# Altium PCB Revolution.PcbDoc (part 2 of 2)
Units mil, origin at the board's own origin, x right, y up, seen from the top; angles counter-clockwise.
Board outline 1417.32 x 1417.32 mil, 4 copper layers (Top Layer, Power, Ground, Bottom Layer), stack 89.2 mil thick; 97 components, 92 nets, 401 pads, 208 vias.
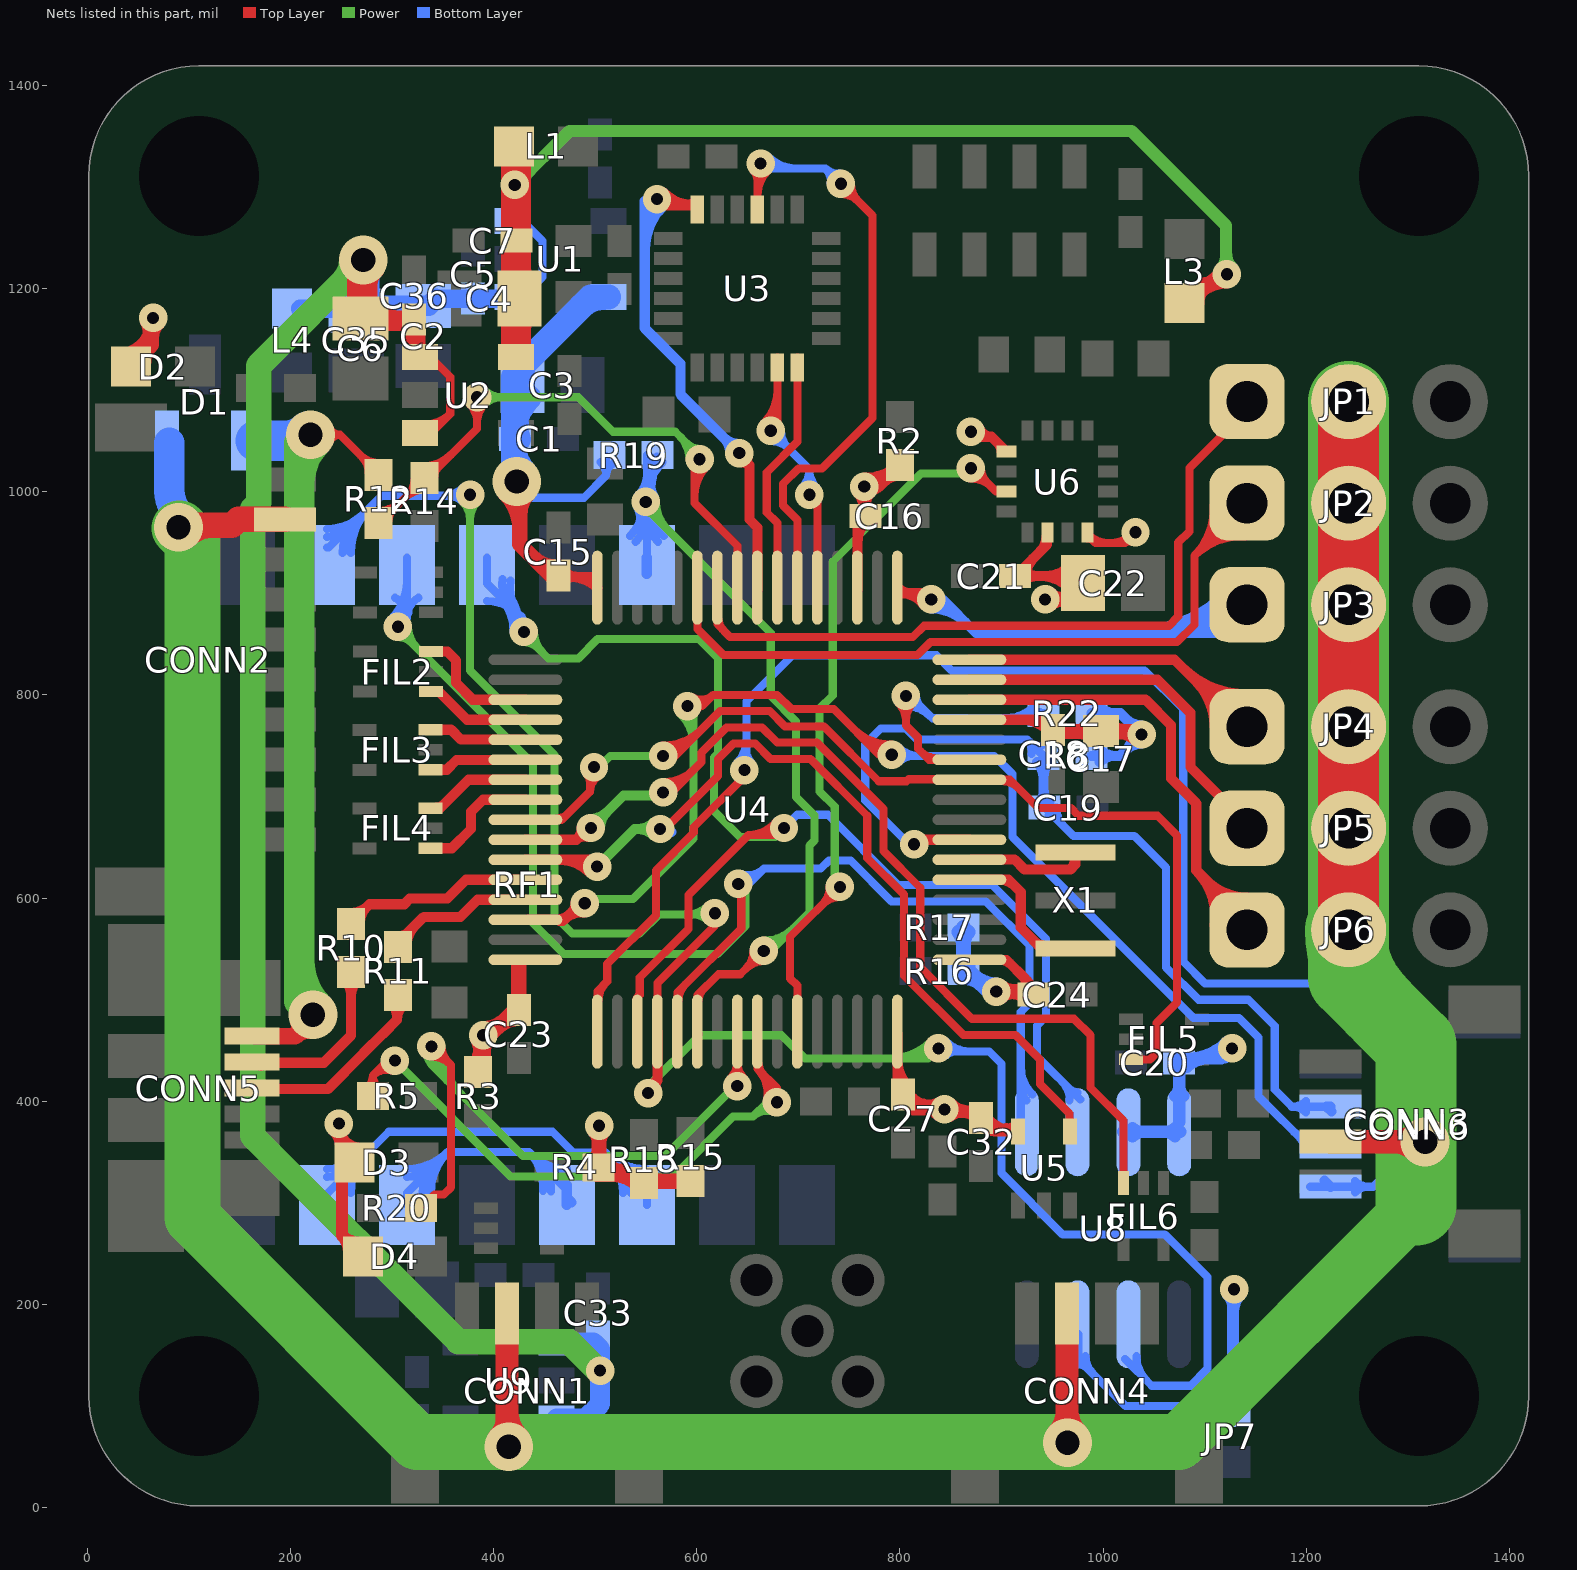
[diagram p4: the nets of this part, all layers, seen from the top]

## Via types
v1: diameter 28, hole 12, Top Layer to Bottom Layer, tented both sides, 200 vias
v2: diameter 48, hole 24, Top Layer to Bottom Layer, tented both sides, 8 vias

## Nets (pads, with @x,y where several pads share a name; then routed paths per layer and width w, separated by ;. In a path a pad name is that pad's centre, name@x,y a point inside that pad or via, vN(x,y) a via of type N, cw(c..) or ccw(c..) an arc to the next point about the centre after c; other vN are vias at no path point) (continued)
NetR19_1: R19.1 RF1.14 U4.54 | length 1367.2
  Top Layer w8: U4.54@601,466.71 601,504.57 621.43,525 643,525 v1(666,548) ; U4.54@602,499.7 cw(c616.2,499.7) 606.16,509.73 ; v1@656,548 cw(c631.86,548) 648.93,530.93 cw(c666,513.86) v1@666,538
  Top Layer w10: U4.54@600.79,466.5 U4.54@601,466.71
  Power w8: v1@550,980 cw(c550,970.34) 556.83,977.17 ; v1@550,992 v1(550,990) 550,984 673,861 673,799 698,774 698,699.43 716,681.43 716,656.57 711,651.57 711,586 673,548 v1(666,548) ; v1@552,990 ccw(c571.31,990) 557.66,976.34 ; v1@560,990 ccw(c598.63,990) 571.31,962.69 ; v1@666,550 ccw(c666,571.73) 681.36,556.36 ; v1@666,558 ccw(c666,599.04) 695.02,570.02
  Bottom Layer w8: RF1.14@534.34,956.43 ccw(c494.12,996.65) 551,996.65 ccw(c607.88,996.65) RF1.14@567.66,956.43 ; RF1.14@540,950.77 ccw(c513.44,977.33) 551,977.33 ccw(c588.56,977.33) RF1.14@562,950.77 ; v1@541.34,985 cw(c522.66,974.22) 543.49,968.64 ; v1@542.93,982.93 cw(c523.44,963.44) RF1.14@551,963.44 ; v1@542.93,997.07 ccw(c523.44,1016.56) 551,1016.56 ; RF1.14@543.04,966.95 cw(c564.59,961.18) v1@554.52,981.08 ; v1@543.08,982.78 cw(c531.01,970.17) RF1.14@547.87,965.65 ; v1@545,981.34 cw(c536.88,967.27) 552.57,971.47 ; v1@545,998.66 ccw(c531.94,1021.28) 557.17,1014.52 ; 550.5,975.48 cw(c559.83,972.98) v1@555,981.34 ; RF1.14@551,934.96 R19.1@551,1036 ; 551,968.27 cw(c571.73,968.27) v1@557.07,982.93 ; v1@551,991.5 cw(c604.15,991.5) R19.1@566.57,1029.08 ; 551,1010.81 cw(c584.84,1010.81) R19.1@560.91,1034.74 ; 551,1011.73 ccw(c571.73,1011.73) v1@557.07,997.07 ; RF1.14@555,962.42 cw(c581.89,969.63) v1@558.43,984.62 ; 556.45,1011.82 ccw(c577.86,1006.08) v1@558.66,995 ; 557.16,973.64 cw(c571.62,977.52) v1@558.66,985
  Bottom Layer w10: RF1.14@551,919 RF1.14@551,927.96 RF1.14@551,934.96
NetR22_2: R22.2 U4.11 | length 401.5
  Top Layer w8: v1@798.93,791.93 cw(c781.86,774.86) 806,774.86 cw(c830.14,774.86) v1@813.07,791.93 ; v1(806,799) 806,770 818,758 818,747 828.79,736.21 U4.11@868.5,736.21 ; 820.69,744.31 ccw(c837.3,760.92) U4.11@837.3,737.43
  Bottom Layer w8: v1@806,789 cw(c806,755.2) 829.9,779.1 ; v1(806,799) 810,799 832,777 936.38,777 R22.2@941.38,782 ; v1@816,799 ccw(c830.49,799) 820.24,788.76 ; 903.73,777 ccw(c903.73,817.68) R22.2@932.49,788.92 ; 923.04,777 ccw(c923.04,798.37) R22.2@938.15,783.26
NetRF1_3: RF1.3 RF1.7 | length 680.6
  Bottom Layer w8: RF1.7@236.04,298.04 236.04,309.04 297,370 458,370 478.59,349.41 510.59,349.41 ; RF1.7@236.04,325.41 ccw(c236.04,364.93) 263.98,336.98 ; RF1.7@236.04,333.41 ccw(c236.04,392.24) 277.64,350.64 ; RF1.7@251.6,309.85 cw(c287.2,309.85) RF1.7@262.03,335.03 ; RF1.7@259.6,309.85 cw(c314.52,309.85) 275.68,348.68 ; 511.38,348.62 cw(c472.62,309.85) RF1.3@527.44,309.85 ; RF1.3@523.83,336.17 ccw(c549.84,362.17) RF1.3@550.65,325.41 ; RF1.3@525.04,334.96 cw(c499.93,309.85) RF1.3@535.44,309.85 ; RF1.3@550.48,333.4 cw(c549.26,388.08) 510.59,349.41 ; RF1.3@551,298.04 551,309 510.59,349.41
NetRF1_4: RF1.4 RF1.6 | length 524.7
  Bottom Layer w8: RF1.6@314.78,298.04 314.78,309.78 355,350 ; RF1.6@314.81,325.41 ccw(c314.89,362.87) RF1.6@341.38,336.38 ; RF1.6@314.83,333.41 ccw(c314.95,390.05) 355,350 ; RF1.6@330.34,309.85 cw(c367.73,309.85) RF1.6@341.29,336.29 ; RF1.6@338.34,309.85 cw(c395.04,309.85) 354.95,349.95 ; 436.98,348.02 ccw(c472.26,383.31) RF1.4@472.26,333.41 ; 447.1,337.9 cw(c423.43,314.24) RF1.4@456.76,311.24 ; RF1.4@448.8,311.96 ccw(c401.24,316.23) 435,350 ; RF1.4@450.63,334.37 ccw(c472.26,356) RF1.4@472.26,325.41 ; RF1.4@472.26,298.04 472.26,305.04 472.26,312.74 435,350 ; 355,350 435,350
  Bottom Layer w10: RF1.4@472.26,298.04 RF1.4@472.26,317.74 ; RF1.4@472.26,305.04 RF1.4@477,300.3
NetRF1_10: RF1.10 U4.52 U8.2 | length 2428.6
  Top Layer w8: v1(552.29,408.08) v1@552.29,411.29 ; U4.52@561.42,468.5 561.42,516.51 618,573.09 v1(618,585)
  Top Layer w10: v1@552.29,411.29 561.42,420.42 ; v1@552.73,417.07 ccw(c553.3,428.54) 561.42,420.42 ; v1@560.22,412.33 cw(c566.27,415.57) 561.42,420.42 ; U4.52@561.42,468.5 561.42,420.42
  Power w8: v1@369.93,989.93 cw(c352.86,972.86) 377,972.86 cw(c401.14,972.86) v1@384.07,989.93 ; v1(377,997) 377,824 460,741 460,582.57 477.57,565 544,565 563,584 v1@617,584 ; v1(552.29,408.08) 552.29,414.51 602.78,465 683.71,465 706.71,442 828,442 v1(838,452) ; 591.44,584 ccw(c591.44,611.56) v1@610.93,592.07 ; 596.27,584 cw(c596.27,563.27) v1@610.93,577.93 ; 789.72,442 ccw(c789.72,500.28) v1@830.93,459.07 ; 809.03,442 ccw(c809.03,480.97) v1@836.59,453.41
  Bottom Layer w8: RF1.10@236.04,944.96 237.96,944.96 260.77,967.77 ; RF1.10@236.04,955.33 ccw(c236.04,987.42) RF1.10@258.73,964.73 ; RF1.10@236.04,963.33 ccw(c236.04,1014.73) 272.39,978.39 ; RF1.10@241.88,962.59 ccw(c246.79,981.75) 260.77,967.77 ; RF1.10@242.16,962.52 ccw(c247.42,982.11) 261.77,967.77 ; RF1.10@251.6,939.77 cw(c294.64,939.77) 264.2,970.2 ; RF1.10@257.48,949.55 cw(c272.25,956.28) 260.77,967.77 ; RF1.10@257.88,948.61 cw(c274.28,955.25) 261.77,967.77 ; RF1.10@259.6,939.77 cw(c321.95,939.77) 277.86,983.86 ; 350.44,996 ccw(c350.44,1023.56) v1@369.93,1004.07 ; 355.27,996 cw(c355.27,975.27) v1@369.93,989.93 ; v1@377,996 290,996 261.77,967.77 ; v1(552.29,408.08) v1@552.29,408.85 ; v1(838,452) 841,449 888,449 900,437 900,329.32 960.32,269 1061,269 1103,227 1103,137 1086,120 1048,120 U8.2@1021.5,146.5 ; v1@845.07,444.93 cw(c854.9,435.1) 854.9,449 ; v1@845.07,459.07 ccw(c869.38,483.38) 869.38,449 ; U8.2@1032.81,149.01 ccw(c1066.19,149.01) 1042.59,125.41 ; 260.77,967.77 261.77,967.77
NetRF1_11: RF1.11 U4.53 U8.5 | length 1660.6
  Top Layer w8: U4.53@581.1,466.5 U4.53@581.1,468.5 581.1,507.33 644,570.23 644,611 v1(641,614) ; U4.53@582.32,499.7 cw(c603.69,499.7) 588.58,514.81
  Power w8: v1@306,857 cw(c306,837.69) 319.66,851.34 ; v1@306,865 439,732 439,575.29 469.29,545 620.43,545 648,572.57 648,607 v1(641,614) ; v1@316,867 ccw(c344.97,867) 324.49,846.51
  Bottom Layer w8: v1@298.93,874.07 ccw(c260.66,912.34) RF1.11@314.78,912.34 ; RF1.11@303.19,895.64 cw(c291.97,875.78) v1@314.78,875.78 ; v1@304.59,868.41 ccw(c279.98,893.02) RF1.11@314.78,893.02 ; v1@305.22,868.84 ccw(c297.59,886.72) 316.36,881.69 ; v1(306,867) v1@314.78,875.78 ; RF1.11@314.78,934.96 RF1.11@314.78,927.96 v1@314.78,875.78 ; RF1.11@326.37,895.64 ccw(c337.59,875.78) v1@314.78,875.78 ; v1(641,614) 651.23,614 666.23,629 ; v1@641.6,615.91 ccw(c646.15,630.41) 656.89,619.66 ; v1@643.99,623.54 ccw(c650.61,644.62) 666.23,629 ; U8.5@919,373.49 919,488 927.67,496.67 927.67,553.67 884.55,596.78 791.99,596.78 751.77,637 730.23,637 722.23,629 666.23,629 ; 919,415.02 ccw(c939.03,415.02) U8.5@924.87,400.85 ; 919,434.33 ccw(c958.34,434.33) U8.5@930.52,406.51
NetRF1_12: RF1.12 U4.51 U8.6 | length 1653.5
  Top Layer w8: U4.51@540.87,500.56 ccw(c533.32,508.11) 544,508.11 ; U4.51@541.73,468.5 U4.51@542,468.76 ; U4.51@542,464 U4.51@542,468.76 ; 667.47,662 ccw(c667.47,683.57) v1@684.43,670.24 ; v1@678.14,675.18 cw(c651,696.53) 651,662 ; v1(686,669) 679,662 651,662 ; U4.51@542,468.76 542,502.75 544,504.75 544,521.72 592,569.72 592,603 651,662
  Power w8: v1@430,852 cw(c430,832.69) 443.66,846.34 ; v1@430,860 454,836 483.57,836 502.57,855 602.43,855 621,836.43 621,742.43 617,738.43 617,685.66 642.66,660 677,660 v1@683,666 ; v1@440,862 ccw(c468.97,862) 448.49,841.51
  Bottom Layer w8: RF1.12@393.52,892.59 cw(c393.52,851.82) 422.35,880.65 ; RF1.12@393.52,934.96 RF1.12@393.52,927.96 393.52,909.48 v1@430,873 ; RF1.12@405.15,897.85 cw(c369.3,862) v1@420,862 ; RF1.12@408.91,913.9 ccw(c443.32,908.86) 418.73,884.27 ; RF1.12@416.83,912.74 ccw(c462.98,905.98) v1@430,873 ; 418.81,884.19 cw(c396.62,862) v1@428,862 ; RF1.12@419.52,891.16 cw(c395.49,877.28) v1@420.86,866.05 ; 427.39,877.53 cw(c413.3,869.4) v1@428.17,862.81 ; v1@430,860 v1(430,862) v1@430,873 ; v1(686,669) 699,682 729.4,682 798.4,613 890.96,613 944,559.96 944,483.77 935,474.77 935,444.23 U8.6@977.62,401.62 ; 959.37,419.86 cw(c940.5,400.99) U8.6@967.19,400.99 ; 967.21,412.02 ccw(c975,419.82) U8.6@975,408.8
NetU3_9: U3.9 U4.22 | length 748.4
  Top Layer w8: v1@655.93,1315.93 cw(c646.48,1306.48) 659.84,1306.48 ; U3.9@659.84,1287.76 659.84,1319.84 v1(663,1323) ; U3.9@659.84,1291.24 cw(c694.76,1291.24) v1@670.07,1315.93 ; U4.22@699.21,903.5 U4.22@699.21,905.5 699.21,972.02 685,986.23 685,1007.77 700.23,1023 723.6,1023 773,1072.4 773,1272 v1(742,1303) ; v1@742,1293 cw(c742,1268.86) 759.07,1285.93 cw(c776.14,1303) v1@752,1303
  Bottom Layer w8: v1(663,1323) 668,1318 727,1318 ; v1@664.41,1324.41 ccw(c679.9,1339.9) 679.9,1318 ; v1@670.07,1330.07 ccw(c699.21,1359.21) 699.21,1318 ; v1@732.05,1303.96 ccw(c714.63,1305.63) 727,1318 ; v1@741.04,1312.95 cw(c739.37,1330.37) 727,1318 ; v1(742,1303) 727,1318
NetU3_12: U3.12 U4.24 | length 644.7
  Top Layer w10: v1@561,1282 U3.12@600,1282 ; v1@567.36,1294.36 ccw(c597.21,1324.21) U3.12@597.21,1282 ; 589.31,1282 ccw(c589.31,1296.61) U3.12@599.64,1286.28 ; v1(642,1038) 642,1036 652,1026 ; v1@643.1,1029.07 cw(c644.4,1018.4) 652,1026 ; v1@650.31,1034.54 ccw(c657.53,1031.53) 652,1026 ; U4.24@659.84,903.5 U4.24@659.84,905.5 659.84,964.72 652,972.56 652,1026
  Bottom Layer w10: 549,1237.3 cw(c611.7,1237.3) v1@567.36,1281.64 ; 549,1261.44 cw(c587.56,1261.44) v1@560.29,1288.71 ; v1@549,1286 549,1161 584,1126 584,1096 v1(642,1038) ; v1@633,1038 ccw(c611.27,1038) 626.64,1053.36 ccw(c642,1068.73) v1@642,1047
  other v1: 561,1288
NetU3_23: U3.23 U4.21 | length 381.4
  Top Layer w8: v1@665.93,1067.07 ccw(c633.1,1099.9) 679.53,1099.9 ; v1@671.59,1061.41 ccw(c652.41,1080.59) 679.53,1080.59 ; v1@679.53,1060 U3.23@679.53,1122.24 U3.23@679.53,1132.24 ; v1(711,997) 718.9,989.1 U4.21@718.9,905.5 U4.21@718.9,903.5
  Bottom Layer w8: v1@673,1050 cw(c673,1025.86) 690.07,1042.93 cw(c707.14,1060) v1@683,1060 ; v1(673,1060) 711,1022 v1(711,997) ; v1@703.93,1004.07 ccw(c686.86,1021.14) 711,1021.14 ccw(c735.14,1021.14) v1@718.07,1004.07
NetU3_24: U3.24 U4.23 | length 245.6
  Top Layer w8: U4.23@679.53,903.5 U4.23@679.53,905.5 679.53,969.08 669,979.6 669,1019 699.21,1049.21 U3.24@699.21,1122.24 U3.24@699.21,1132.24
NetU4_5: U4.5 X1.1 | length 175.5
  Top Layer w8: X1.1@942.24,547.76 X1.1@973,547.76
  Top Layer w10: U4.5@870.4,618 907,618 919,606 919,571 X1.1@942.24,547.76 ; U4.5@899.7,617.89 cw(c899.7,600) 912.35,612.65 ; 933.16,556.84 ccw(c941.5,565.19) X1.1@941.5,553.39
NetU4_6: U4.6 X1.2 | length 134.7
  Top Layer w10: U4.6@870.72,638 913,638 923,628 968,628 ; X1.2@970.45,643.68 cw(c958.48,637.52) 968,628 ; X1.2@973,642.24 973,633 968,628
NetU4_59: U4.59 U6.15 | length 801.5
  Top Layer w8: U4.59@699.21,466.5 U4.59@699.21,468.5 699.21,513.79 692,521 692,550.23 692,562 v1(741,611) 744,614 v1@746,614 ; v1@731,611 cw(c706.86,611) 723.93,593.93 cw(c741,576.86) v1@741,601 ; v1@869,1018 876.95,1018 894.79,1000.16 U6.15@904.8,1000.16 ; v1@870,1013 cw(c870,984.14) 890.4,1004.55 ; v1@880,1023 ccw(c899.43,1023) 885.69,1009.26
  Power w8: v1@734,606 736,608 736,690.01 721,705.01 721,786.57 734,799.57 734,931 821,1018 v1@869,1018
  other v1: 870,1023
NRST: C19.2 CONN6.2 R8.1 U4.7 | length 1082.8
  Top Layer w10: v1(814,653) 818.47,657.47 U4.7@868.5,657.47
  Power w8: v1@812.43,659 812.43,654.57 v1(814,653)
  Bottom Layer w8: v1@806.23,657 v1@807,657 ; v1(814,653) 809.23,653 766,696.23 766,751.77 781.23,767 806,767 816.78,756.22 925.16,756.22 ; 926.08,755.3 ccw(c939.41,768.64) R8.1@939.41,749.78 ; R8.1@929.77,741.67 ccw(c913.43,744.49) 925.16,756.22 ; C19.2@941.38,690.62 970.81,661.19 1030.81,661.19 1062,630 1062,531.82 1093.82,500 1143,500 1169,474 1169,411.5 1185.81,394.69 CONN6.2@1220.31,394.69 ; R8.1@941.38,740 925.16,756.22 ; C19.2@946.31,681.19 cw(c946.31,670.33) C19.2@953.99,678.01 ; C19.2@954.13,689 ccw(c980.99,689) 961.99,670.01 ; CONN6.2@1199.67,389.16 ccw(c1186.34,375.83) 1186.34,394.69 ccw(c1186.34,413.54) CONN6.2@1199.67,400.21
  Bottom Layer w10: R8.1@935.17,733.79 cw(c920.18,718.8) 941.38,718.8 cw(c962.57,718.8) R8.1@947.59,733.79 ; C19.2@937.56,693.82 ccw(c928.35,703.03) 941.38,703.03 ; C19.2@941.38,690.62 R8.1@941.38,740 ; 941.38,707.86 ccw(c961.24,707.86) C19.2@947.19,693.82 ; CONN6.2@1220,395 CONN6.2@1220.31,394.69 ; CONN6.2@1223.9,394.69 CONN6.2@1220.31,394.69 ; CONN6.2@1225,390 CONN6.2@1220.31,394.69
S1_IN: FIL2.3 U4.35 | length 125.7
  Top Layer w10: FIL2.3@338.48,842.68 354.5,842.68 363.29,833.9 363.29,811.71 379.73,795.27 U4.35@431.5,795.27
S2_IN: FIL2.1 U4.36 | length 104.5
  Top Layer w10: FIL2.1@338.48,803.32 346.23,803.32 373.96,775.58 U4.36@431.5,775.58
S3_IN: FIL3.3 U4.37 | length 95.4
  Top Layer w10: FIL3.3@338,765.68 358.4,765.68 368.09,756 U4.37@429.39,756
S4_IN: FIL3.1 U4.38 | length 97
  Top Layer w10: FIL3.1@338,726.31 354.02,726.31 363.71,736 U4.38@431,736
S5_IN: FIL4.3 U4.39 | length 112
  Top Layer w10: FIL4.3@338,688.37 347.37,688.37 375.53,716.53 U4.39@431.5,716.53 ; FIL4.3@344.3,688.88 ccw(c344.3,697.53) 350.42,691.42
S6_IN: FIL4.1 U4.40 | length 123.3
  Top Layer w10: FIL4.1@338,649 359,649 378,668 378,685 389.84,696.84 U4.40@431.5,696.84
SERVO_OUT_1: JP1.1 U4.26 | length 754.4
  Top Layer w8: U4.26@620.47,903.5 620.47,869.64 633.03,857.09 812.78,857.09 823.69,868 1065,868 1074,877 1074,950 1085,961 1085,1023.23 1145,1083.23 JP1.1@1145,1090 ; U4.26@621.69,874.3 ccw(c635.88,874.3) 625.85,864.27
SERVO_OUT_2: JP2.1 U4.27 | length 958
  Top Layer w8: U4.27@600.79,903.5 600.79,864.7 626.4,839.09 817.4,839.09 830.32,852 1073,852 1090,869 1090,937 ; JP2.1@1108.8,986.69 cw(c1044.33,982.68) 1090,937 ; JP2.1@1116.78,987.18 cw(c1067.94,984.15) 1102.54,949.54 cw(c1137.15,914.94) JP2.1@1140.18,963.78 ; JP2.1@1124.77,987.68 cw(c1091.55,985.61) 1115.08,962.08 cw(c1138.61,938.55) JP2.1@1140.68,971.77 ; JP2.1@1139.69,955.8 ccw(c1135.68,891.33) 1090,937 ; JP2.1@1141.73,971.73 JP2.1@1141.73,988.73 1090,937
SERVO_OUT_3: JP3.1 U4.17 | length 827.7
  Top Layer w10: U4.17@797.64,903.5 U4.17@801.14,900 ; U4.17@797.79,905.66 ccw(c811.45,919.31) 811.45,900 ; v1@823.78,888.63 ccw(c801.14,871.78) U4.17@801.14,900 ; v1@833,900 U4.17@801.14,900
  Bottom Layer w10: v1@830,894 v1(831,894) 842,894 875,861 1121,861 JP3.1@1141.73,881.73 ; v1@831,885 cw(c831,836.72) 865.14,870.86 ; v1@831,895 cw(c831,870.86) 848.07,887.93 ; 1021.67,861 ccw(c1021.67,1008.8) JP3.1@1126.18,904.29 ; 1045.81,861 ccw(c1045.81,984.66) JP3.1@1133.25,897.22 ; 1069.95,861 ccw(c1069.95,960.52) JP3.1@1140.32,890.15 ; 1094.09,861 ccw(c1094.09,936.38) JP3.1@1147.39,883.08 ; JP3.1@1141.73,880.73 JP3.1@1141.73,881.73 ; JP3.1@1141.73,888.73 JP3.1@1141.73,881.73
SERVO_OUT_4: JP4.1 U4.16 | length 538.4
  Top Layer w10: U4.16@868.5,834.64 1070.36,834.64 1136.27,768.73 JP4.1@1141.73,768.73 ; 1077.77,827.23 ccw(c1141.73,891.19) JP4.1@1141.73,800.73 ; 1090.97,814.03 cw(c1045.68,768.73) JP4.1@1109.73,768.73 ; 1094.84,810.16 ccw(c1141.73,857.05) JP4.1@1141.73,790.73 ; JP4.1@1108.04,796.96 cw(c1079.82,768.73) JP4.1@1119.73,768.73 ; JP4.1@1111.91,793.09 ccw(c1141.73,822.91) JP4.1@1141.73,780.73
SERVO_OUT_5: JP5.1 U4.15 | length 367.8
  Top Layer w8: 1053.5,814.95 1053.73,814.73
  Top Layer w10: U4.15@868.5,814.95 1053.5,814.95 ; 1053.73,814.73 1086,782.46 1086,729 1141.73,673.27 JP5.1@1141.73,668.73
SERVO_OUT_6: JP6.1 U4.14 | length 615.8
  Top Layer w10: U4.14@868.5,795.27 1041.92,795.27 1067,770.18 1067,718 1091.73,693.27 1091.73,627.27 ; 1101.67,617.33 ccw(c1141.73,657.39) JP6.1@1141.73,600.73 ; 1106,613 cw(c1071.3,578.29) JP6.1@1119.93,571.69 ; JP6.1@1110.02,573.04 ccw(c1046.17,581.7) 1091.74,627.26 ; JP6.1@1118.74,600.26 ccw(c1141.73,623.25) JP6.1@1141.73,590.73 ; JP6.1@1141.73,568.73 1141.73,577.27 1091.73,627.27
STAT: R5.2 U4.57 | length 742.2
  Top Layer w8: R5.2@275.26,412.63 ccw(c265.04,425.38) 281.38,425.38 ; R5.2@281.38,405 281.38,425.38 ; R5.2@287.5,412.63 cw(c297.72,425.38) 281.38,425.38 ; v1@300.33,430.36 ccw(c295.13,411.63) 281.38,425.38 ; U4.57@659.84,466.5 660,466.34 660,432 ; U4.57@661.06,437.3 ccw(c676.4,437.3) 665.55,426.45 ; v1@669.21,401.05 ccw(c636.02,408.02) 660,432 ; 670.45,421.55 cw(c653.3,404.39) v1@677.04,399.41 ; v1(679,399) 679,413 660,432 ; 281.38,425.38 292,436 v1@296,436 ; v1@296,436 299,436 v1(303,440) 296.67,435.13 v1@296,436
  Power w8: v1(303,440) 417,326 577,326 636,385 655.57,385 ; 664.56,393.98 cw(c673.93,384.61) v1@678.34,397.11 ; v1@675.68,389.57 ccw(c669.25,371.32) 655.57,385 ; v1(679,399) 669.57,399 655.57,385
SWDCLK: CONN6.4 U4.49 | length 1644.1
  Top Layer w8: U4.49@502.36,466.5 U4.49@502.36,468.5 502.36,508.36 512,518 512,534.98 560,582.98 560,627.23 597.17,664.4 597.17,669.91 647,719.75 v1(647,726) ; U4.49@503.58,499.7 cw(c527.44,499.7) 510.57,516.57
  Bottom Layer w8: v1@639.93,733.07 ccw(c618.03,754.97) 649,754.97 ; v1(647,726) 649,728 649,793.77 694.23,839 836,839 851,824 1041,824 1079,786 1079,537.44 1100.44,516 1219,516 1280,455 1280,330 1265.94,315.94 CONN6.4@1223.9,315.94 CONN6.4@1203.98,315.94 ; 649,745.31 ccw(c666.31,745.31) v1@654.07,733.07 ; CONN6.4@1248.12,310.42 cw(c1261.46,297.09) 1261.46,315.94 cw(c1261.46,334.8) CONN6.4@1248.12,321.47
  Bottom Layer w10: CONN6.4@1217.84,322 CONN6.4@1223.9,315.94
SWDIO: CONN6.3 U4.46 | length 1521.1
  Top Layer w8: v1(591,789) 605.35,789 ; v1@592.04,790.71 ccw(c599.26,802.65) 609.13,792.78 ; v1@596.18,797.56 ccw(c604.7,811.64) 616.35,800 ; v1@600.38,785.54 cw(c605.35,783.71) 605.35,789 ; v1@600.38,792.46 ccw(c605.35,794.29) 605.35,789 ; 754.44,766.56 ccw(c792,804.11) v1@792,751 ; 768.1,752.9 ccw(c792,776.8) v1@792,743 ; v1(792,741) 780,741 735,786 693.23,786 679.23,800 616.35,800 ; 605.35,789 616.35,800
  Top Layer w10: U4.46@434.23,579 470,579 ; U4.46@462.7,578.95 ccw(c462.7,596.46) 475.08,584.08 ; U4.46@462.85,578.89 ccw(c466.37,582.63) 470,579 ; 477.46,586.46 ccw(c468.93,595) v1@481,595 ; v1@489.24,586.03 ccw(c487.19,561.82) 470,579 ; v1(490,595) 486,595 470,579
  Power w8: v1@495,599 537.43,599 597,658.57 597,783 v1(591,789) ; v1@583.93,781.93 cw(c552.37,750.37) 597,750.37 ; v1@589.59,787.59 cw(c571.69,769.69) 597,769.69
  Bottom Layer w8: v1@791,740 v1@802,740 ; v1(792,741) 801,741 v1@802,740 ; v1@799.07,733.93 cw(c813.73,719.27) 813.73,740 ; v1@799.07,748.07 ccw(c818.56,767.56) 818.56,740 ; 1187.36,370.52 ccw(c1205.2,388.36) CONN6.3@1205.2,363.13 ; CONN6.3@1193.73,364.14 cw(c1184.9,355.32) CONN6.3@1197.39,355.32 ; CONN6.3@1223.9,355.32 1202.56,355.32 1153,404.87 1153,462.77 1133.77,482 1089.19,482 911,660.19 911,722 893,740 v1@802,740
TO_REGS: C2.1 C5.1 C6.1 C33.2 C35.1 C36.1 L4.1 U1.1 U1.3 U2.1 U2.3 U9.1 U9.3 | length 2289
  Top Layer w8: U2.1@327.76,1132.4 337.84,1132.4 357.47,1112.77 357.47,1076.47 ; U2.3@332.77,1066.39 ccw(c333.14,1100.81) 357.47,1076.47 ; U2.3@340,1059 357.47,1076.47
  Top Layer w20: C6.1@275.15,1168.38 323,1168.38 323,1137.16 U2.1@327.76,1132.4 ; C6.1@283.15,1162.29 cw(c297.85,1147.58) 297.85,1168.38 ; C6.1@283.15,1178.77 ccw(c308.23,1203.85) 308.23,1168.38
  Top Layer w25: C6.1@271,1172.53 C6.1@275.15,1168.38
  Top Layer w30: C6.1@271,1172.53 271,1228 v2@274,1231 ; 271,1203.86 cw(c296.14,1203.86) v2@278.36,1221.64
  Power w20: v1@503,135 v1(505,135)
  Power w25: 251.66,1206.66 ccw(c230.32,1228) v2@260.5,1228 ; 254.08,1209.08 cw(c272,1191.15) v2@272,1216.5 ; v2@281.5,1226.5 271.5,1226.5 169,1124 169,989.09 163,983.09 163,366 365.5,163.5 474.5,163.5 v1@503,135
  Bottom Layer w8: U1.1@418.76,1191.6 428.84,1191.6 448.47,1211.23 448.47,1246.76 428.84,1266.4 U1.3@418.76,1266.4
  Bottom Layer w18: L4.1@210,1180 C35.1@264.53,1180 ; C2.1@343.47,1190 U1.1@417.16,1190
  Bottom Layer w20: C35.1@268,1179 268,1176.53 C35.1@271,1173.53 ; C35.1@269,1171.53 C35.1@269.97,1172.5 ; C35.1@275.74,1178.26 280.47,1183 336.47,1183 C2.1@343.47,1190 ; U1.1@417.16,1190 U1.1@418.76,1191.6 ; U9.3@462.24,87.6 490.6,87.6 505,102 v1(505,135) 505,156 C33.2@498.6,162.4 ; U9.1@462.24,162.4 C33.2@498.6,162.4 ; v1@501.59,137.09 ccw(c484.05,147.85) C33.2@498.6,162.4
  Bottom Layer w25: v2@271,1220 271,1227 v2(272,1228)
  Bottom Layer w30: C35.1@269.97,1172.5 271,1172.5 C35.1@271,1173.53
  Bottom Layer w40: C35.1@268,1179 268,1217 v2@271,1220
UART1_RX: U4.43 U5.4 | length 955.1
  Top Layer w8: v1(564,668) 569,668 621,720 621,736.77 636.23,752 657.77,752 672.77,737 712,737 768,681 768,639.6 804.09,603.52 804.09,523.6 862.5,465.19 914.04,465.19 938,441.23 938,417 967,388 967,375 U5.4@969,373 ; 967,384.72 ccw(c975.99,384.72) U5.4@969.63,378.37
  Top Layer w10: U4.43@431.5,637.79 495.21,637.79 v1(502,631) ; U4.43@463.89,637.79 cw(c463.89,592.89) v1@495.64,624.64 ; 488.03,637.79 cw(c488.03,617.03) v1@502.71,631.71
  Power w10: v1(502,631) 539,668 v1(564,668) ; v1@557.64,661.64 ccw(c542.27,646.27) 542.27,668 ccw(c542.27,689.73) v1@557.64,674.36
  Bottom Layer w10: v1(564,668) 572,668 v1@575,665
UART1_TX: FIL6.3 U4.42 | length 1065
  Top Layer w8: v1@567,706 ccw(c567,730.14) 584.07,713.07 ; v1@567,714 ccw(c567,757.46) 597.73,726.73 ; v1@574.62,701.38 574.62,703.62 605,734 605,743.4 629.6,768 664.4,768 679.4,753 718.63,753 784,687.63 784,646.23 820.09,610.14 820.09,532.23 871.13,481.19 971.58,481.19 987.71,465.06 987.71,413.29 1020,381 FIL6.3@1020,322.48
  Top Layer w10: U4.42@431.5,657.47 481.47,657.47 ; 482.76,658.76 ccw(c472.51,669) v1@487,669 ; v1@493.33,660.4 ccw(c489.83,649.11) 481.47,657.47 ; v1(496,669) 493,669 481.47,657.47
  Power w10: v1(496,669) 528,701 564,701 v1(567,704) ; v1@496,678 ccw(c496,699.73) 511.36,684.36 ccw(c526.73,669) v1@505,669
USB_D_N: R10.1 U4.44 | length 230.5
  Top Layer w10: R10.1@253,573 257,573 278,594 312.18,594 317.73,599.54 354.54,599.54 373.1,618.1 U4.44@431.5,618.1 ; R10.1@260,585.37 ccw(c260,607.99) 276,592 ; R10.1@268.78,576.59 cw(c288.55,576.59) 274.57,590.57
USB_D_P: R11.1 U4.45 | length 177.8
  Top Layer w10: R11.1@305,555 331.54,581.54 367.54,581.54 384.42,598.42 U4.45@431.5,598.42 ; R11.1@306,562.37 ccw(c306,577.75) R11.1@316.87,566.87 ; R11.1@314.78,553.59 cw(c341.79,553.59) 322.69,572.69
USB_PWR: CONN5.1 D1.1 R12.1 | length 1011.2
  Top Layer w8: v2(220,1056) 249,1056 ; v2@238.69,1048.89 cw(c249,1044.98) 249,1056 ; v2@238.69,1063.11 ccw(c249,1067.02) 249,1056 ; 269.3,1035.7 ccw(c287,1053.41) R12.1@287,1028.37 ; 270.72,1034.28 cw(c255.04,1018.59) R12.1@277.22,1018.59 ; R12.1@290,1018.62 286.38,1018.62 249,1056
  Top Layer w16: v2@220,479 v2@233,479
  Top Layer w16.5: CONN5.1@165.15,464 205,464 ; v2@207.88,479.02 cw(c195.37,473.63) 205,464 ; v2@220,479 205,464 ; v2@220.73,469.59 ccw(c218.74,450.26) 205,464
  Power w30: 209,539.19 ccw(c276.27,539.19) v2@228.7,491.62 ; 209,1007.72 cw(c268.28,1007.72) v2@226.36,1049.64 ; v2@219,1058 209,1048 209,498.6 v2(222.34,485.26)
  Bottom Layer w40: 166,1050 v2@215,1050 ; 195.86,1050 ccw(c195.86,1080.14) v2@217.17,1058.83
USB_R_N: CONN5.2 R10.2 | length 201.9
  Top Layer w10: CONN5.2@171.18,435 174.18,438 233,438 260,465 260,517.33 R10.2@255,522.33 ; CONN5.2@183.51,440.97 ccw(c190.68,448.14) 190.68,438 ; R10.2@253.79,519.2 cw(c238.8,504.21) 260,504.21 cw(c281.2,504.21) R10.2@266.21,519.2
USB_R_P: CONN5.3 R11.2 | length 232.5
  Top Layer w10: CONN5.3@170.59,410 172.59,412 237,412 272,447 272,447.18 291.82,467 292,467 305,480 ; CONN5.3@183.51,415.38 ccw(c191.67,423.54) 191.67,412 ; R11.2@299.79,496.2 cw(c287.22,483.63) 305,483.63 ; R11.2@305,508 305,480 ; R11.2@311.97,495.98 ccw(c326.83,479.98) 305,479.98
VBUS_SEN: R12.2 R14.2 U4.25 | length 861.4
  Top Layer w8: R12.2@287,981.13 ccw(c287,1012.81) 309.41,990.41 ; R12.2@290,971 R12.2@290.38,971.38 ; R12.2@290,971.38 R12.2@290.38,971.38 ; R12.2@295,971.38 R12.2@290.38,971.38 ; R12.2@296.78,971.35 cw(c312.31,971.35) 301.33,982.33 ; 313.01,994.01 cw(c332,975.01) R14.2@332,1001.87 ; 316.26,997.26 ccw(c301.86,1011.65) R14.2@322.22,1011.65 ; R14.2@329.5,1007.5 384,1062 v1@384,1092 ; R14.2@332,1017.37 ccw(c332,1035.16) R14.2@344.58,1022.58 ; R14.2@332,1025.37 ccw(c332,1062.48) 358.24,1036.24 ; R14.2@338.24,1019.24 R12.2@290.38,971.38 ; R14.2@341.78,1015.59 cw(c351.89,1015.59) R14.2@344.74,1022.74 ; v1@376.93,1085.93 cw(c359.86,1068.86) 384,1068.86 cw(c408.14,1068.86) v1@391.07,1085.93 ; 598,995.79 cw(c639.21,995.79) v1@610.07,1024.93 ; 598,1015.1 cw(c619.9,1015.1) v1@604.41,1030.59 ; v1@600,1032 598,1030 598,989 640.16,946.84 U4.25@640.16,905.5 U4.25@640.16,903.5
  Power w8: v1@383,1093 v1(384,1093) 483.57,1093 517.57,1059 579,1059 600,1038 v1@600,1032 ; v1@391.07,1085.93 cw(c408.14,1068.86) 408.14,1093 cw(c408.14,1117.14) v1@391.07,1100.07 ; 583.81,1054.19 cw(c561.62,1032) v1@593,1032 ; 591.05,1046.95 ccw(c603,1058.9) v1@603,1042
  other v1: 603,1032
VCC: C1.1 C3.1 C15.1 C16.2 C17.2 C18.1 C20.2 C21.1 C22.2 C23.1 C24.2 C27.1 C32.1 D2.2 D3.2 D4.2 JP7.2 R2.1 R3.2 R4.2 R8.2 R15.1 R16.1 R17.1 R18.1 R19.2 R22.1 U1.5 U4.1 U4.13 U4.19 U4.32 U4.48 U4.64 U5.5 U6.2 U6.4 U6.13 U8.3 U8.7 U8.8 | length 5095.4
  Top Layer w8: v1@241.3,370.58 cw(c227.7,355.51) D3.2@248,355.51 ; v1@243.8,368.93 cw(c239.26,359.12) 249.7,361.91 cw(c255.93,363.58) v1@252.82,369.24 ; D3.2@248,358.51 ccw(c267.18,358.51) D3.2@263.44,339.69 ; v1@248,368.25 ccw(c269.12,368.25) D3.2@265,347.54 ; v1@254.7,370.58 ccw(c268.3,355.51) D3.2@248,355.51 ; D3.2@263.5,340 D3.2@248,355.5 ; D3.2@266.56,355.38 cw(c271.06,378) v1(248,378) D3.2@248,355.5 ; C24.2@924,511 927,508 930,505 C24.2@931.38,505 ; U6.4@984.53,954.16 cw(c984.53,946.15) U6.4@990.19,951.81 ; U6.4@984.53,964.8 U6.4@984.53,960 984.53,957.47 992.44,949.56 1021.56,949.56 ; U6.4@985.87,957.41 ccw(c1004.83,976.37) 1004.83,949.56 ; 1007.92,949.56 ccw(c1007.92,977.07) v1@1030.37,961.16 ; v1@1022.81,956.06 cw(c1017.39,953.73) 1021.56,949.56 ; v1@1028.06,950.81 ccw(c1025.73,945.39) 1021.56,949.56 ; v1(1032,960) 1021.56,949.56
  Top Layer w10: D3.2@251,327.53 D3.2@263.5,340 ; R3.2@380,423.62 R3.2@385,428.62 R3.2@390,433.62 ; v1(390,465) v1@396.38,465 ; v2@413,1007 v2@426,994 ; C15.1@456.62,917.38 C15.1@459,917.38 ; C15.1@457,916 U4.32@502,916 ; C15.1@468.82,912.56 cw(c477.12,904.26) 477.12,916 ; C15.1@468.82,922.19 ccw(c483.77,937.15) 483.77,916 ; 476.5,916 cw(c476.5,879.64) U4.32@502.21,905.35 ; U4.19@758.27,903.5 U4.19@758.27,905.5 758.27,965.89 766.38,974 C16.2@765,975.38 ; 758.27,949.48 cw(c788.96,949.48) C16.2@767.26,971.18 ; C27.1@797.64,400.98 U4.64@797.64,466.5 ; U4.64@797.64,439.95 ccw(c832.39,439.95) C27.1@807.82,415.38 ; C27.1@800,398.62 800.62,398 806,398 813,391 C32.1@883,391 ; C27.1@800.75,400.43 ccw(c823.51,423.2) 823.51,391 ; C27.1@807.82,407.5 ccw(c847.65,447.34) v1@847.65,391 ; 819.86,391 ccw(c819.86,416.14) v1@837.64,398.36 ; 822.96,397.62 ccw(c828.6,418.67) v1@839.5,399.79 ; 823.05,397.59 cw(c817.45,376.67) v1@836.21,387.5 ; 824.69,391 cw(c824.69,372.69) v1@837.64,385.64 ; v1@849.44,384.83 cw(c861.1,369.47) 866.09,388.1 ; v1@850.36,385.64 cw(c863.31,372.69) 863.31,391 ; v1@850.36,398.36 ccw(c868.14,416.14) 868.14,391 ; v1@851.79,396.5 ccw(c864.86,404.04) 860.95,389.47 ; v1@855.25,391 cw(c855.25,362.81) C32.1@875.18,382.74 ; U4.13@868.5,775.58 941.04,775.58 C18.1@951,765.62 C18.1@952.62,764 ; v1@869,1054 890.33,1054 ; U4.1@870.14,539 905,539 924,520 ; C32.1@877.64,377.54 ccw(c893.76,392.23) 893.76,370.42 ; v1@878.41,1062.21 ccw(c890.33,1066.76) 890.33,1054 ; C32.1@880,383.62 893.2,370.42 ; C32.1@882.02,373.18 cw(c885.32,362.54) 893.2,370.42 ; C32.1@885.03,384.27 ccw(c916.41,412.87) U5.5@916.41,370.42 893.2,370.42 ; 896.87,1047.46 cw(c888.94,1039.53) U6.13@900.16,1039.53 ; U4.1@899.7,539.15 cw(c899.7,526.71) 908.5,535.5 ; 904.73,373.55 ccw(c907.12,382.49) U5.5@914.84,377.37 ; U6.13@904.8,1039.53 890.33,1054 ; C21.1@910,913 C21.1@914,917 ; C21.1@913.62,917 C21.1@914,917 ; 920.01,775.58 cw(c920.01,738.57) C18.1@946.18,764.74 ; C21.1@922.38,912.18 cw(c934,900.56) 934,917 cw(c934,933.44) C21.1@922.38,921.82 ; C24.2@924,511 924,520 ; C21.1@924.37,917 cw(c949.41,917) 931.7,934.7 ; 924.71,519.29 cw(c910.42,505) C24.2@930.63,505 ; C24.2@929.91,511.35 cw(c933.29,520) 924,520 ; 937.62,917 cw(c937.62,873.06) C22.2@968.7,904.13 ; 938.02,941.02 ccw(c922.98,956.06) U6.2@944.25,956.06 ; 942.91,917 ccw(c942.91,953.47) C22.2@968.7,927.68 ; U6.2@945,954.8 945,948 C21.1@914,917 ; C22.2@980.47,910 973.47,917 C21.1@914,917 ; v1@1035,764 v1(1038,761)
  Top Layer w12: D2.2@39.38,1136.05 ccw(c28.35,1171) v1(65,1171) 65,1144.5 ; D2.2@43,1124.61 ccw(c33.52,1154.63) 65,1154.63 ; D2.2@43.5,1123 65,1144.5 ; D2.2@44.33,1136.66 ccw(c45.96,1163.53) 65,1144.5 ; D2.2@57.16,1123.83 cw(c84.03,1125.46) 65,1144.5 ; v1@58.12,1166.91 cw(c42.23,1157.46) 60.09,1152.68 cw(c77.95,1147.89) v1@68.91,1164.02 ; v1@59.34,1165.34 cw(c45.69,1151.69) 65,1151.69 cw(c84.31,1151.69) v1@70.66,1165.34 ; D3.2@251,327.53 251,268 ; D4.2@257.9,248.46 ccw(c234.02,251.02) 251,268 ; D4.2@268,251 251,268 ; D4.2@270.58,260.65 cw(c268.87,285.87) 251,268 ; R4.2@495,335 R4.2@502,328 ; R18.1@548.38,328 R18.1@555,321.38 ; R15.1@594,321.38 R15.1@600,321.38 ; v1@759.34,999.34 cw(c745.69,985.69) 765,985.69 cw(c784.31,985.69) v1@770.66,999.34 ; v1@764.81,1001 ccw(c765.82,1022.19) 780.81,1007.19 ; C16.2@765,975.38 v1(765,1005) 778.62,1005 R2.1@800,1026.38 ; v1@765,993.36 ccw(c783.73,993.36) C16.2@770.49,980.11 ; v1@765.38,1012.99 ccw(c767.56,1058.82) R2.1@800,1026.38 ; 766.16,989.03 cw(c774.59,991.29) v1@769.59,998.45 ; 783.36,1009.74 cw(c800,993.1) R2.1@800,1016.63 ; R2.1@788.11,1014.49 ccw(c778.19,1024.41) R2.1@792.22,1024.41
  Top Layer w15: R3.2@380.56,435.03 ccw(c357.77,457.82) v1@390,457.82 ; v1@384.37,461.75 cw(c365.29,450.73) 386.57,445.03 ; v1@385.4,460.4 cw(c374.31,449.31) 390,449.31 cw(c405.69,449.31) v1@394.6,460.4 ; R3.2@390,433.62 v1(390,465) ; v1@390,471.5 ccw(c390,502.59) 411.98,480.61 ; v1@396.38,465 425,493.62 U4.48@425,536 ; 404.09,472.71 cw(c425,451.8) C23.1@425,481.37 ; v2@411.33,998.33 cw(c375.92,962.92) 426,962.92 ; 426,977.41 cw(c455.59,977.41) v2@434.67,998.33 ; v2@426,994 426,948 C15.1@456.62,917.38 ; 437.32,936.68 ccw(c464,963.35) C15.1@464,925.63 ; R4.2@499.18,339.44 ccw(c487.55,351.07) 504,351.07 ; v1@499.4,371.4 cw(c488.31,360.31) 504,360.31 cw(c519.69,360.31) v1@508.6,371.4 ; R4.2@502,328 R18.1@548.38,328 ; R4.2@504,337 v1(504,376) ; 504,349.25 ccw(c517.87,349.25) R4.2@508.06,339.44 ; R4.2@510.03,339.44 ccw(c537.65,367.06) R18.1@537.65,328 ; R4.2@516.78,328 cw(c516.78,290.12) R18.1@543.56,316.91 ; 525.59,331.23 cw(c518.35,304.23) R18.1@542.56,318.21 ; R18.1@552.44,316.91 cw(c563.24,306.11) 563.24,321.38 ; R18.1@552.44,325.79 ccw(c563.08,336.43) 563.08,321.38 ; R18.1@555,321.38 R15.1@594,321.38 ; R15.1@589.56,316.94 ccw(c578.84,306.22) 578.84,321.38 ccw(c578.84,336.54) R15.1@589.56,325.82 ; v1(895,508) C24.2@927,508 ; v1@899.6,503.4 cw(c910.69,492.31) 910.69,508 cw(c910.69,523.69) v1@899.6,512.6 ; 909.79,508 cw(c909.79,487.35) C24.2@924.39,501.95 ; v1(943,894) 964.47,894 C22.2@980.47,910 ; v1@947.6,889.4 cw(c958.69,878.31) 958.69,894 cw(c958.69,909.69) v1@947.6,898.6 ; C18.1@952.62,764 v1@1035,764 ; C18.1@954.05,768.67 ccw(c965.32,779.95) 965.32,764 ; 974.77,764 ccw(c974.77,785.82) C17.2@990.2,770.39 ; 977.47,764 cw(c977.47,746) C17.2@990.2,758.73 ; C17.2@1005.8,758.73 cw(c1018.53,746) 1018.53,764 ; C17.2@1005.8,770.39 ccw(c1021.23,785.82) 1021.23,764 ; C17.2@1015.07,764 cw(c1015.07,738.07) v1@1033.4,756.4
  Top Layer w20: D4.2@268.5,241.5 D4.2@268.5,250
  Power w12: v2(423,1010) v2@423,1018
  Bottom Layer w8: v2@414,994 489,994 511,1016 R19.2@511,1035 ; R19.2@505.53,1029.05 cw(c492.58,1015.95) 511,1015.95 cw(c524.78,1015.95) R19.2@517.54,1027.68 ; U8.3@975,141.2 cw(c975,127.21) 984.89,137.11 ; U8.3@975,147 1022,100 1107,100 JP7.2@1112,95 ; U8.3@982.81,149.01 ccw(c1006.53,149.01) 989.76,132.24 ; 1080.31,100 cw(c1080.31,54.57) JP7.2@1112.44,86.69 ; 1099.63,100 cw(c1099.63,73.88) JP7.2@1118.1,92.35 ; 1104.46,100 ccw(c1104.46,111.29) JP7.2@1112.44,103.31
  Bottom Layer w10: R16.1@862.62,528 R16.1@868,528 ; v1@894.62,514 896,514 v1@900,510 ; U8.3@975,147 U8.3@975,170.51 ; R8.2@988.62,740 1017,740 v1(1038,761) 1017,782 R22.1@988.62,782 ; R8.2@996.8,733.79 cw(c1011.79,718.8) 1011.79,740 cw(c1011.79,761.2) R8.2@996.8,746.21 ; R22.1@996.8,775.79 cw(c1011.79,760.8) 1011.79,782 cw(c1011.79,803.2) R22.1@996.8,788.21 ; v1@1038,752 ccw(c1038,730.27) 1022.64,745.64 ccw(c1007.27,761) 1029,761 ccw(c1007.27,761) 1022.64,776.36 ccw(c1038,791.73) v1@1038,770
  Bottom Layer w12: U8.7@1019.73,370 U8.8@1076,370 ; U8.7@1029.11,365.38 cw(c1040.26,354.23) 1040.26,370 ; U8.7@1029.11,373.6 ccw(c1037.8,382.28) 1037.8,370 ; 1059.74,370 cw(c1059.74,354.23) U8.8@1070.89,365.38 ; 1062.21,370 ccw(c1062.21,382.28) U8.8@1070.89,373.6 ; C20.2@1070.51,433.89 cw(c1059.68,423.06) 1075,423.06 ; U8.8@1070.89,405.09 ccw(c1060.97,415.01) 1075,415.01 ccw(c1089.03,415.02) U8.8@1079.11,405.09 ; C20.2@1072.62,442 C20.2@1075,442 ; U8.8@1075,379.49 C20.2@1075,442 ; 1075,424.88 cw(c1087.74,424.88) C20.2@1078.73,433.89 ; C20.2@1082.67,433.89 cw(c1102.24,414.31) 1102.24,442 ; C20.2@1083.54,442 ccw(c1083.54,495.46) v1@1121.34,457.66 ; 1112.51,442 ccw(c1112.51,466.49) v1@1129.83,449.17 ; JP7.2@1122.36,101.89 ccw(c1108.74,115.51) 1128,115.51 ; v1@1123.34,209.34 cw(c1112.1,198.1) 1128,198.1 ; v1@1124.1,444.54 ccw(c1120,434) 1112,442 ; v1@1125,455 1112,442 ; JP7.2@1128,94 v1@1128,214 ; 1128,121.56 ccw(c1155.81,121.56) JP7.2@1136.14,101.89 ; 1128,193.27 cw(c1150.73,193.27) v1@1134.66,209.34 ; C20.2@1075,442 1112,442
  Bottom Layer w15: R16.1@858.18,532.44 ccw(c847.46,543.16) 862.62,543.16 ccw(c877.78,543.16) R16.1@867.06,532.44 ; R17.1@858.18,566.56 cw(c847.46,555.84) 862.62,555.84 cw(c877.78,555.84) R17.1@867.06,566.56 ; R16.1@862.62,528 R17.1@862.62,571 ; R16.1@864.59,521.72 cw(c864.59,498.33) 881.13,514.87 ; R16.1@868,528 886,510 v1@900,510 ; R16.1@871.95,524.05 ccw(c895,547.09) v1@895,514.5 ; 878.86,516.18 ccw(c888.39,532.69) v1@893.32,514.28
  Bottom Layer w25: v2@414,1007 420,1013 C3.1@420,1113 ; C1.1@420,1045.01 ccw(c458.01,1045.01) v2@431.13,1018.13 ; C1.1@420,1056.54 cw(c471.03,1056.54) C3.1@434.94,1092.62 ; 422.73,1066.74 ccw(c441.93,1061.59) C1.1@424.72,1051.66 ; C3.1@428.47,1105 428.47,1124.15 495.92,1191.6 U1.5@513.24,1191.6 ; 486.65,1182.33 cw(c508.32,1160.66) U1.5@508.32,1191.3
  other v1: 1129,215 844,392 1127,452 870,1059
VCC_ANA: C4.1 C7.1 L1.1 L3.2 U2.5 | length 1284.4
  Top Layer w12: L3.2@1080,1185.5 1085.5,1185.5 1114,1214 v1(1122,1214) ; L3.2@1080,1199.19 ccw(c1080,1245.51) v1@1112.76,1212.76 ; L3.2@1093.68,1185.5 cw(c1113.44,1185.5) L3.2@1099.47,1199.47 ; L3.2@1094.69,1194.69 cw(c1122,1167.37) v1@1122,1206 ; L3.2@1096.09,1203.13 cw(c1111.8,1175.93) v1@1119.93,1206.27
  Top Layer w30: U2.5@422.24,1135 422.24,1302 L1.1@422.24,1339 ; 422.24,1160.11 cw(c449.52,1160.11) C4.1@430.23,1179.39 ; 422.24,1219.89 ccw(c449.52,1219.89) C4.1@430.23,1200.61 ; L3.2@1079.5,1185 L3.2@1080,1185.5
  Power w12: v1@421,1310 ccw(c421,1331.73) 436.36,1316.36 ; v1@422,1294 422,1302 475,1355 1028,1355 1121,1262 v1@1121,1214 ; v1@429,1302 cw(c445.9,1302) 433.95,1313.95 ; v1@1116.34,1219.66 ccw(c1105.1,1230.9) 1121,1230.9 ; 1121,1235.72 ccw(c1143.72,1235.72) v1@1127.66,1219.66
  other v1: 421,1302
VCC_UNREG: CONN1.2 CONN2.2 CONN3.2 CONN4.2 D1.2 JP1.2 JP2.2 JP3.2 JP4.2 JP5.2 JP6.2 | length 4747.1
  Top Layer w20: v2@413.39,66.61 v2@415,65 ; v2@964.57,64.43 v2(965,64)
  Top Layer w23: v2@406.16,68.84 ccw(c388.72,86.28) 413.39,86.28 ; v2@413.39,66.61 CONN1.2@413.39,191.1 ; 413.39,94.07 ccw(c449.07,94.07) v2@423.84,68.84 ; v2@956.16,72.84 ccw(c935.87,93.13) 964.57,93.13 ; v2@964.57,64.43 CONN4.2@964.57,191.1 ; 964.57,95.22 ccw(c996.22,95.22) v2@973.84,72.84 ; CONN3.2@1223.9,360.32 v2@1325,360.32 ; 1286.06,360.32 cw(c1286.06,329.06) v2@1308.16,351.16 ; 1287.58,360.32 ccw(c1287.58,389.42) v2@1308.16,368.84
  Top Layer w25: v2(90,965) 92,967 143,967 149,973 CONN2.2@195,973 ; v2@98.13,956.87 cw(c122.59,932.41) 122.59,967
  Top Layer w60: JP6.2@1241.73,568.73 JP5.2@1241.73,668.73 JP4.2@1241.73,768.73 JP3.2@1241.73,888.73 JP2.2@1241.73,988.73 JP1.2@1241.73,1088.73
  Power w55: v2@91,964 104,951 104,285.34 324.84,64.5 1074.5,64.5 1308,298
  Power w80: JP6.2@1238.73,568.73 ccw(c1345.27,568.73) 1269.94,493.4 ; JP1.2@1241.73,1088.73 JP2.2@1241.73,988.73 JP3.2@1241.73,888.73 JP4.2@1241.73,768.73 JP5.2@1241.73,668.73 JP6.2@1241.73,568.73 1241.73,521.6 1308,455.34 1308,298
  Bottom Layer w25: v2@81,974 v2(90,965) ; v2@91.2,966.2 v2@92.6,967.6
  Bottom Layer w30: D1.2@81,1048 81,1001.28 ccw(c116.13,1001.28) 91.29,976.44 v2@96.36,971.36
  Bottom Layer w50: JP6.2@1241.73,568.73 JP5.2@1241.73,668.73 JP4.2@1241.73,768.73 JP3.2@1241.73,888.73 JP2.2@1241.73,988.73 JP1.2@1241.73,1088.73
  other v2: 415,60 1317,360
"VOLT / SONAR": FIL5.3 U4.10 U4.41 | length 1132.5
  Top Layer w8: U4.41@434.65,677 467.2,677 495,704.8 v1@495,733 ; U4.41@462.7,678.37 ccw(c462.7,692.57) 472.73,682.53 ; v1@491.93,721.93 cw(c484.51,714.51) 495,714.51 ; 495,704.47 cw(c513.49,704.47) v1@504.09,720.39 ; v1@561,746 v1(567,740) 578.98,740 622.98,784 672,784 687,769 725.25,769 779.25,715 806.77,715 808.77,717 U4.10@868,717 ; v1@567,742 ccw(c567,775.74) 590.86,751.88 ; v1@567,750 ccw(c567,803.05) 604.51,765.54 ; U4.10@868.5,716.53 908.32,716.53 936.22,688.63 968.37,688.63 976,681 1053.63,681 1073,661.63 1073,497.37 1052.67,477.04 1052.67,447.67 1046.32,441.32 FIL5.3@1027.52,441.32 ; U4.10@899.7,715.31 cw(c899.7,691.57) 916.49,708.36
  Power w8: v1(499,729) 504,729 515,740 v1(567,740)
WARN: R20.2 U4.56 | length 837.8
  Top Layer w8: R20.2@323.62,295 R20.2@328.62,295 341.94,308.31 351.15,308.31 358.18,315.34 358.18,435.82 340,454 v1(339,454) ; v1@339,444 cw(c339,417.44) 357.78,436.22 ; v1@349,454 ccw(c370.73,454) 355.36,438.64 ; v1@632.93,422.07 ccw(c615.86,439.14) 640,439.14 ccw(c664.14,439.14) v1@647.07,422.07 ; v1@640,417 640,466.34 U4.56@640.16,466.5
  Power w8: v1@333,454 ccw(c361.97,454) 341.49,433.51 ; v1@333.72,445.51 cw(c327.8,436) 339,436 ; v1(339,454) 339,436 ; v1@341,454 ccw(c389.28,454) 355.14,419.86 ; v1@344.28,445.51 ccw(c350.2,436) 339,436 ; v1@349,454 ccw(c416.6,454) 368.8,406.2 ; v1@640,417 639.72,417 568.72,346 429,346 339,436
  other v1: 640,415
pads on no net: CONN1.0 CONN2.0 CONN3.0 CONN4.0 CONN5.4 CONN6.0 RF1.8 U3.2 U3.3 U3.4 U3.5 U3.6 U3.7 U3.14 U3.15 U3.16 U3.17 U3.19 U3.21 U3.22 U4.2 U4.3 U4.4 U4.58 U6.3 U6.5 U6.6 U6.7 U6.14 U7.5 U7.6

## Polygon pours and split planes (outlines as drawn)
GND on Bottom Layer "Bottom Layer-GND" (solid, remove dead copper, pour order 10): 1.73,110 1.73,1310.79 cw(c110,1310.79) 110,1419.06 1310.79,1419.06 cw(c1310.79,1310.79) 1419.06,1310.79 1419.06,110 cw(c1310.79,110) 1310.79,1.73 110,1.73 cw(c110,110)
VCC on Power "PWR Layer-VCC" (solid, remove dead copper, pour order 13): 18.29,117.56 ccw(c126.56,117.56) 126.56,9.29 1219,15 1310.79,1.73 ccw(c1310.79,110) 1419.06,110 1279,489 1175,1148 1105,1147 1105,1349 300,1348 300,1287 235,1288 152,1207 52,1207 52,1103 153,1103 153,973 47,973 49,233 36,181
GND on Top Layer "Top Layer-GND" (solid, remove dead copper, pour order 9): 1.73,110 1.73,1310.79 cw(c110,1310.79) 110,1419.06 1310.79,1419.06 cw(c1310.79,1310.79) 1419.06,1310.79 1419.06,110 cw(c1310.79,110) 1310.79,1.73 110,1.73 cw(c110,110)
GND on Ground "GND Layer-GND" (solid, remove dead copper, pour order 11): 1.73,110 ccw(c110,110) 110,1.73 1310.79,1.73 ccw(c1310.79,110) 1419.06,110 1419.06,1310.79 ccw(c1310.79,1310.79) 1310.79,1419.06 110,1419.06 ccw(c110,1310.79) 1.73,1310.79

## Keep-outs
Top Layer:
  circle w3.94: c1310.79,1310.79 r59.06
  circle w3.94: c1310.79,1310.79 r106.3
  circle w3.94: c110,1310.79 r106.3
  circle w3.94: c110,1310.79 r59.06
  circle w3.94: c1310.79,110 r106.3
  circle w3.94: c1310.79,110 r59.06
  circle w3.94: c110,110 r106.3
  circle w3.94: c110,110 r59.06
Bottom Layer:
  circle w3.94: c1310.43,111.73 r106.3
  circle w3.94: c110.43,111.73 r106.3
  circle w3.94: c110.43,1311.73 r106.3
  circle w3.94: c1310.43,1311.73 r106.3
Keep-Out Layer:
  the board outline again, w10

## Other copper
Top Layer:
  rectangle net GND: 1014,567 1045,629
  pour cut-out: 134,373 134,350 197,350 197,373
  pour cut-out: 101.17,475.41 101.17,350.41 128.72,350.41 129,350.13 129,475.87
  pour cut-out: 905,526 905,660 1055,660 1055,526
  pour cut-out: 890,1074 890,947 1019,947 1019,1074
Ground:
  pour cut-out: 890,1074 890,947 1019,947 1019,1074
  pour cut-out: 1190,1140 1295,1140 1295,515 1190,515
Power:
  pour cut-out: 890,1074 890,947 1019,947 1019,1074
  pour cut-out: 1103.97,1150 1102.97,823 1101.97,500 1416.03,500 1416.97,500.94 1416.97,1150
  pour cut-out: 647.5,375.5 642.5,110.5 772.5,110.5 772.5,375.5
Bottom Layer:
  pour cut-out: 890,1074 890,947 1019,947 1019,1074

## Silkscreen, mask and mechanical layers (free items; w line width, h text height)
Top Overlay:
  circle w10: c970,330 r5
  text "F" at 607,1359 h150
  text "" at 226.38,1320 h137.8
  text "" at 1104.33,1320 h137.8
  text "Sig" at 1110,1170 h50
  text "-" at 1329,1162 h90
  text "+" at 1223,1158 h80
  text "Pow" at 17,1157 h60
  text "1" at 1037,1067 h65
  text "2" at 1037,967 h65
  text "3" at 1037,839 h65
  text "4" at 1037,750 h65
  text "5" at 1037,650 h65
  text "10" at 201,607 h50
  text "6" at 1037,550 h65
  text "S" at 380,321 h60
  text "W" at 184,232 h60
  text "Pwr Sen" at 1202,212 h50
  text "Sonar" at 1211,181 h50
  text "Flexi" at 195,145 h55
  text "Main" at 1120,145 h50
  text "Port" at 205,105 h55
  text "Port" at 1120,105 h55
Bottom Overlay:
  lines w7: 1130,1165 1145,1150 ; 1145,1210 1145,1150 ; 1160,1165 1145,1150
  text "Sig" at 1190,1230 h80
  text "-" at 1331.73,1191.73 h90
  text "+" at 1226.73,1186.73 h80
  text "C" at 786,1184 h160
  text "A" at 1063,1179 h260
  text "www.OpenPilot.org" at 35,452.76 h60 r270
  text "GND" at 1175,425 h30
  text "NRS" at 1175,390 h30
  text "IO" at 1175,350 h30
  text "CLK" at 1175,305 h30
  text "SWD" at 1325,180 h40
  text "3.3V" at 1086,87 h50
  text "BL" at 1162,41 h50 r270
Mechanical 1:
  the board outline again, w10
Mechanical 15:
  lines w7: 605,1077.17 605,1287.17 815,1287.17 815,1077.17 605,1077.17
Mechanical 16:
  lines w10: 240,710 415,710 415,985 240,985 240,710

## Dimensions
1.73,-17.95 to 1419.06,-27.79 on Dimensions
110,-17.95 to 1310.79,-17.95 on Dimensions
-17.95,110 to -17.95,1310.79 on Dimensions
-17.95,1.73 to -17.95,1419.06 on Dimensions
1269.03,1352.55 to -2430,-1943 on Dimensions